# Altium PCB PCB1.PcbDoc
Units mil, origin at the board's own origin, x right, y up, seen from the top; angles counter-clockwise.
Board outline 3937.01 x 3346.46 mil, 2 copper layers (Top Layer, Bottom Layer), stack 62.992 mil thick; 38 components, 44 nets, 165 pads, 31 vias.
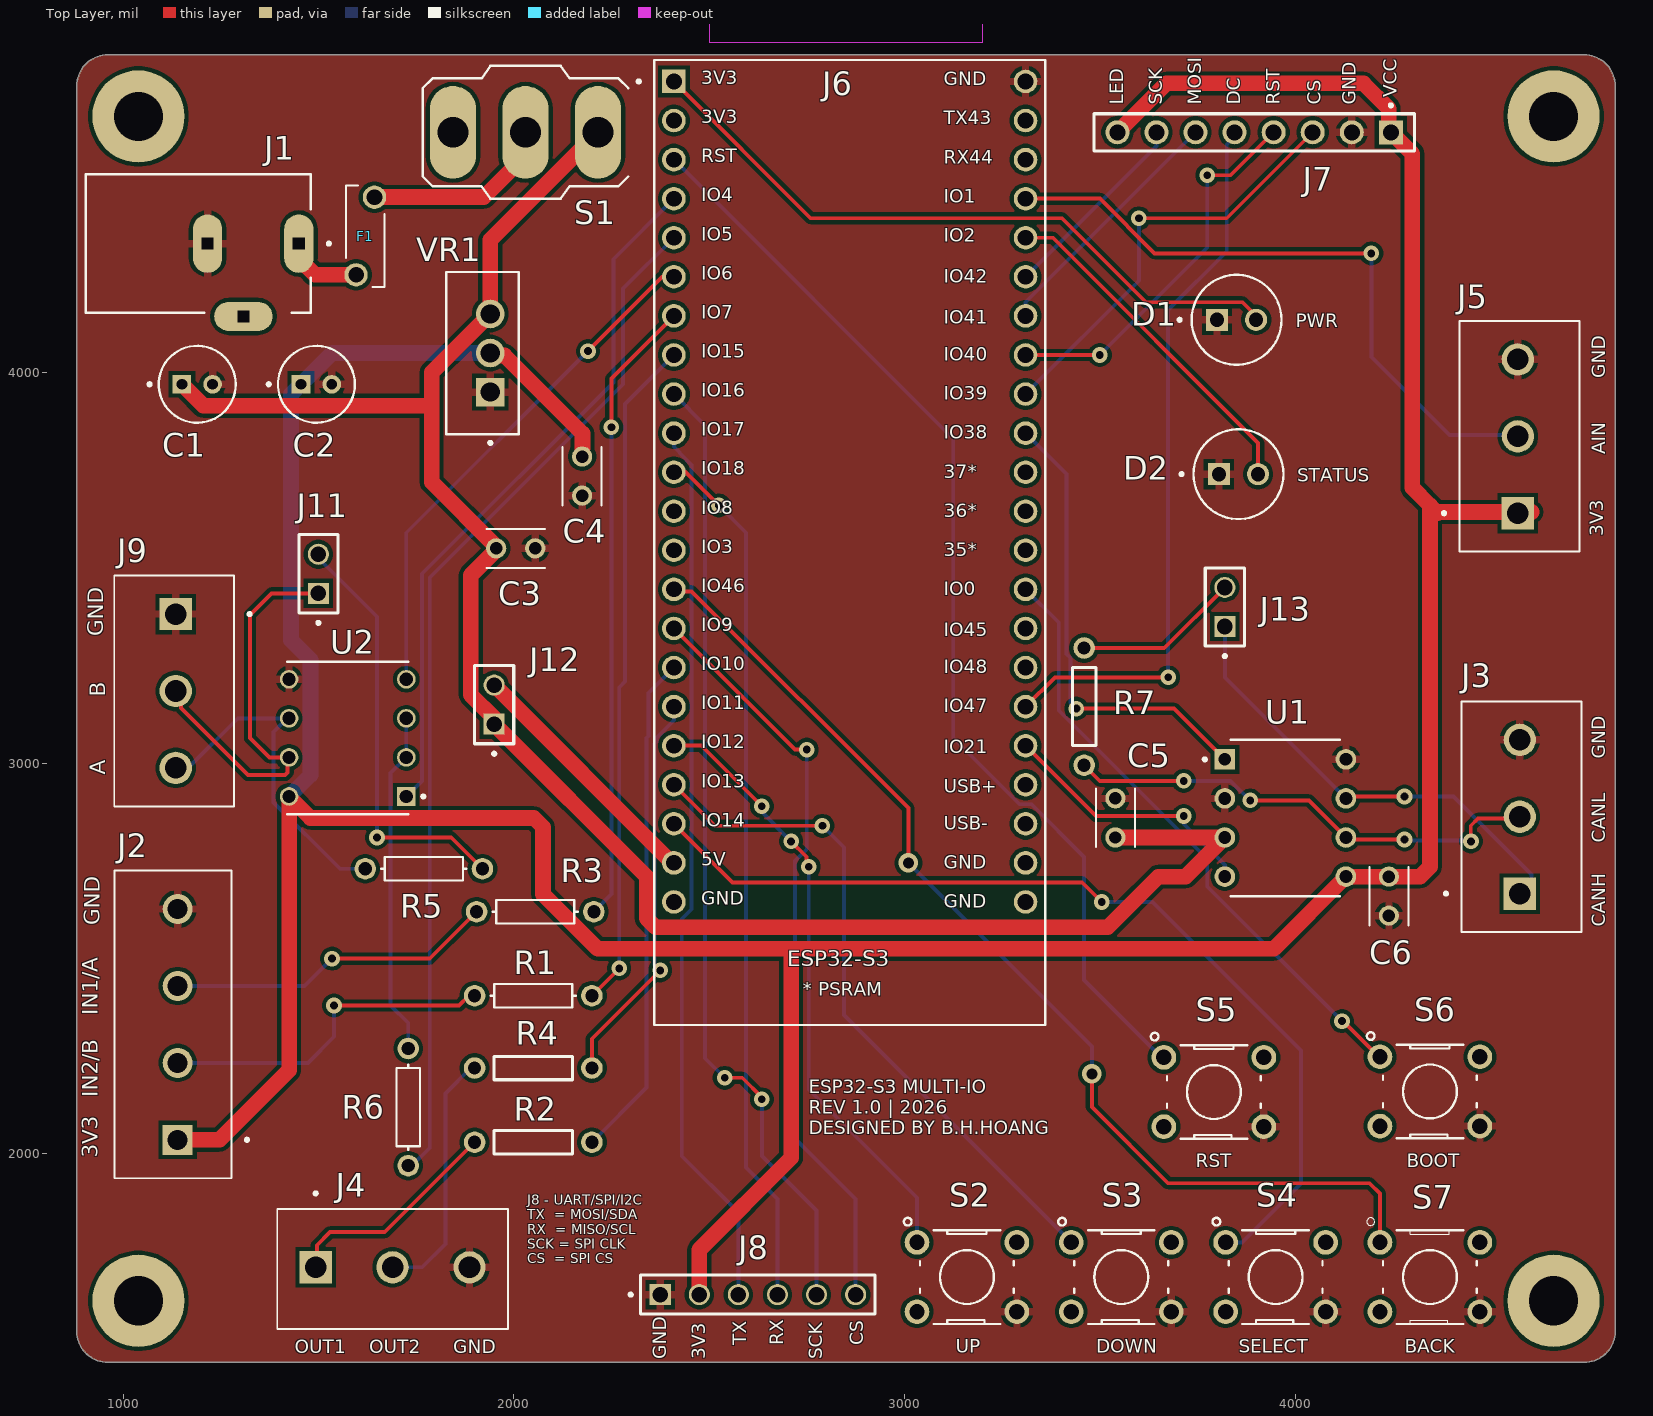
[diagram p0: Top Layer view]
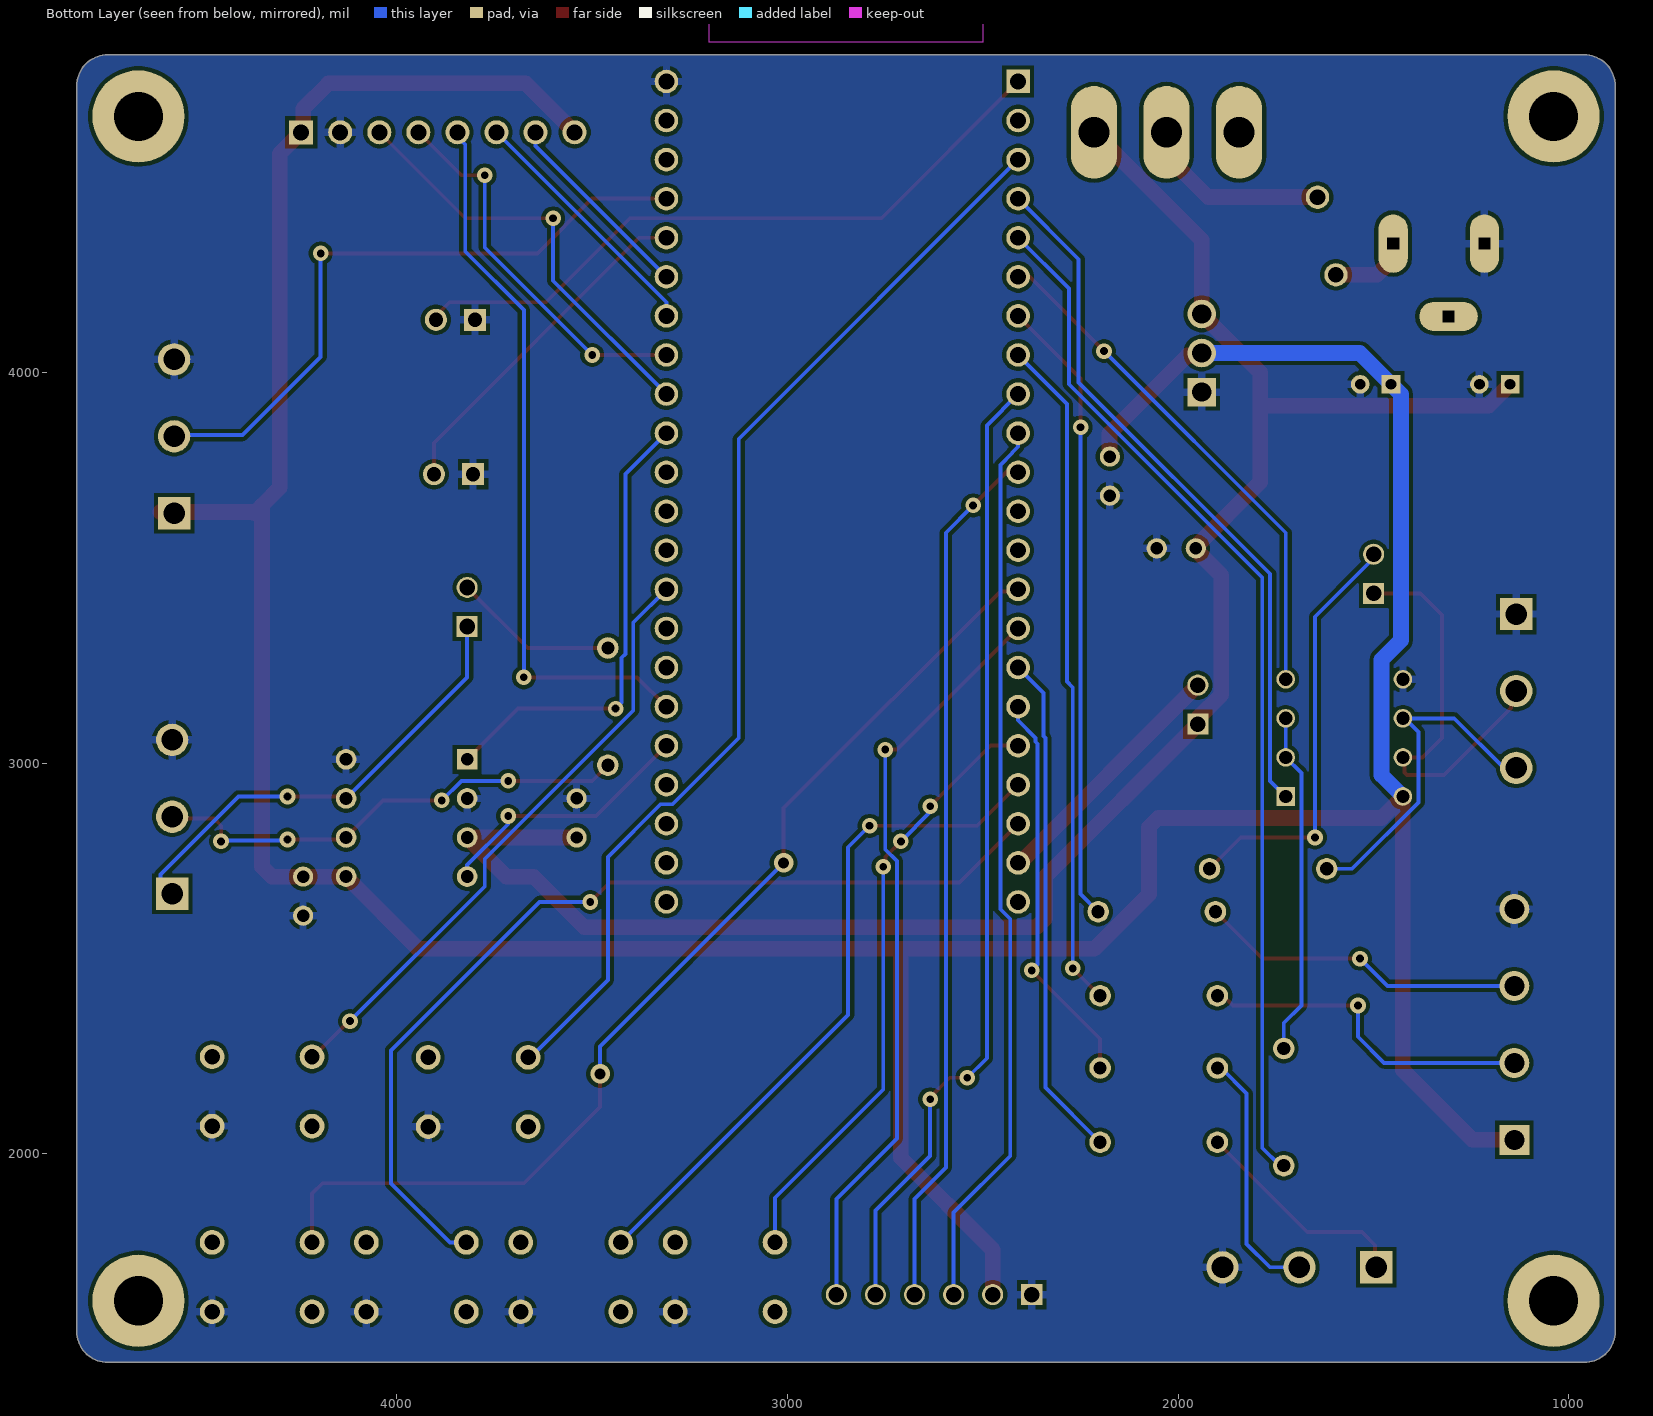
[diagram p1: Bottom Layer view, seen from below]
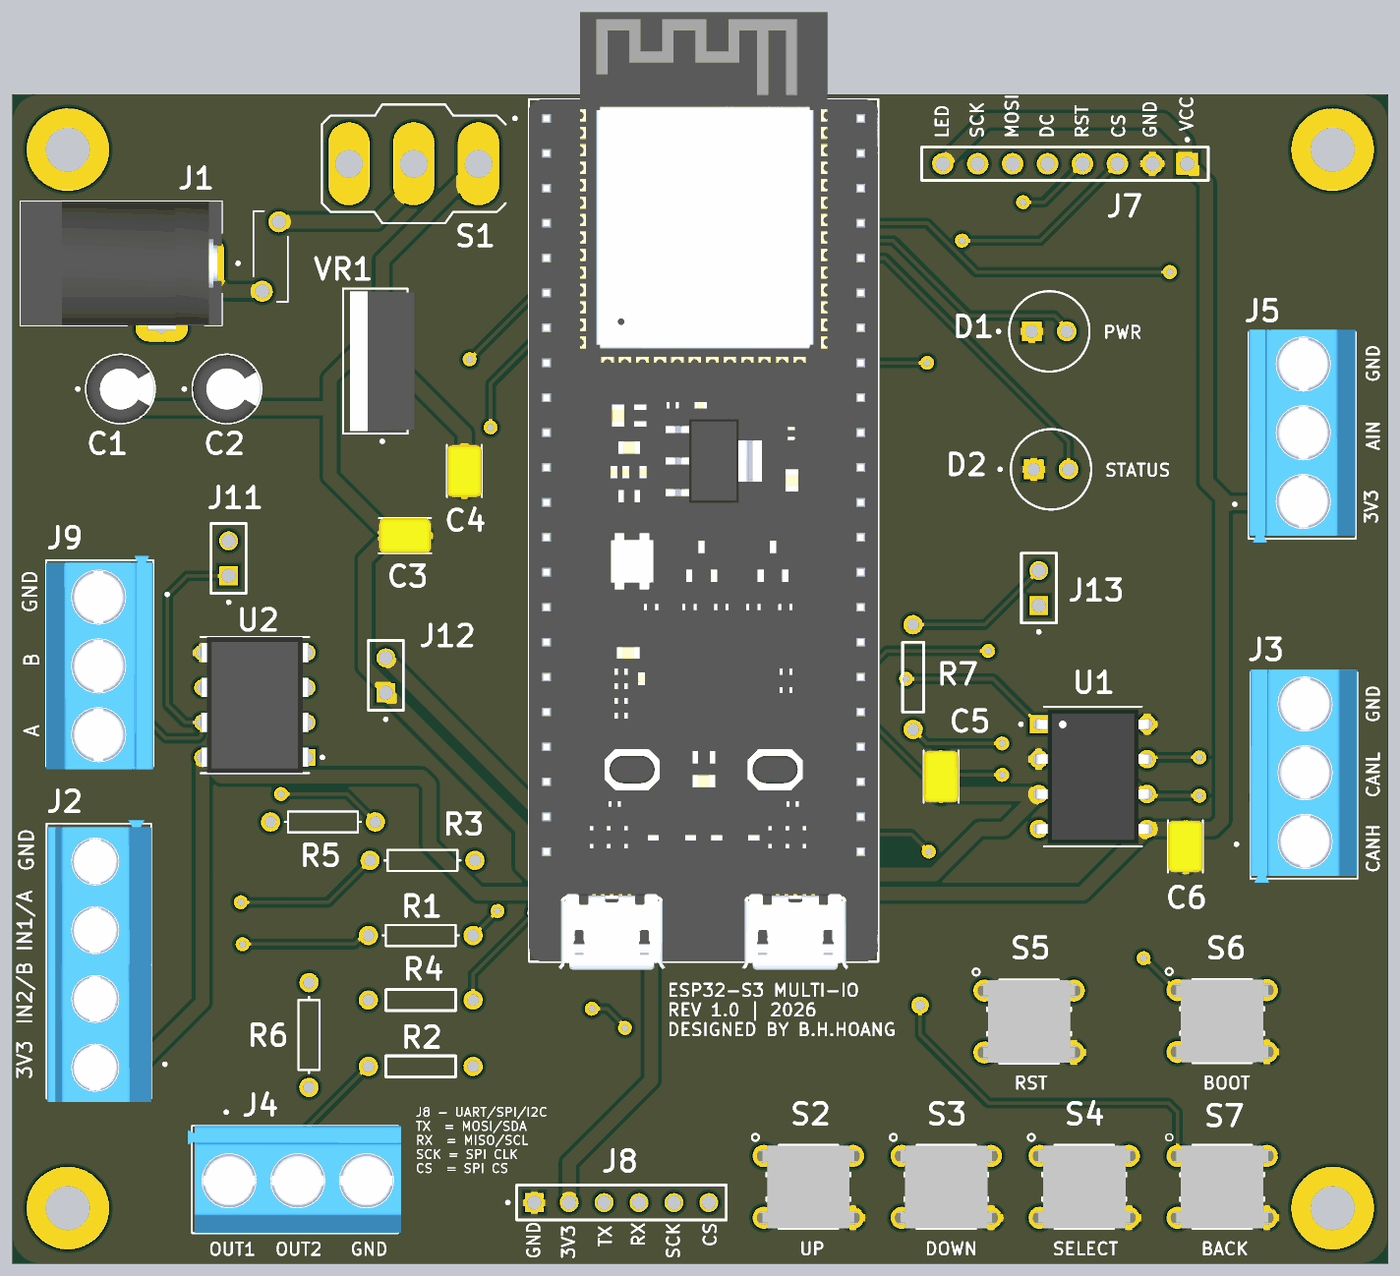
[diagram p2: 3D render of the assembled board from above, using the file's embedded part models]

## Layer stack, top to bottom
Top Solder: solder mask 0.4, Solder Resist, Dk 3.5
Top Layer: signal copper 1.4
Dielectric 1: dielectric 60.1921, FR-4, Dk 4.8
Bottom Layer: signal copper 1.4
Bottom Solder: solder mask 0.4, Solder Resist, Dk 3.5

## Board outline
881.94,1545.35 ccw(c960.68,1545.35) 960.68,1466.61 4740.21,1466.61 ccw(c4740.21,1545.35) 4818.95,1545.35 4818.95,4734.32 ccw(c4740.21,4734.32) 4740.21,4813.06 960.68,4813.06 ccw(c960.68,4734.32) 881.94,4734.32

## Design rules (kind name [scope] priority, off if disabled: settings)
Clearance [All] p1: gap=10 ignorepadtopadclearanceinfootprint=FALSE except(0: Arc-Hole Track-Hole SMDPad-Hole THPad-Hole Via-Hole Fill-Hole Poly-Hole Region-Hole Text-Hole)
HoleSize [All] p1: absolutevalues=TRUE maxlimit=125.98 minlimit=11.81 maxpercent=80.000 minpercent=20.000 // Minimum drilled hole 0.30 mm; maximum 3.20 mm includes four M3 mounting holes MH1-MH4.
PolygonConnect [All] p1: connectstyle=Relief reliefconductorwidth=20 reliefentries=4 polygonreliefangle="90 Angle" airgapwidth=10
RoutingVias [All] p1: holewidth=20 width=40 viastyle="Through Hole" minholewidth=20 minwidth=40 maxholewidth=28 maxwidth=50
SolderMaskExpansion [All] p1: expansion=4 istentingtop=FALSE
Width POWER_5V_WIDTH [InNet('MAIN5V') Or InNet('NetF1_1') Or InNet('NetF1_2') Or InNet('DEVKIT5V')] p1: maxlimit=60 minlimit=20 preferedwidth=40
Width POWER_3V3_WIDTH [InNet('3V3')] p2: maxlimit=60 minlimit=20 preferedwidth=40
Width GND_WIDTH [InNet('GND')] p3: maxlimit=60 minlimit=20 preferedwidth=40
Width [All] p4: maxlimit=10 minlimit=10 preferedwidth=10
29 further rules are at their usual default settings.

## Components (designator, comment, footprint, x,y, rotation, side; value= is the part's Value field where it differs from the comment)
C1 "UVR1C220MDD" CAPPRD200W50D550H1250 1190,3970 r0 top
C2 "UVR1C220MDD" CAPPRD200W50D550H1250 1495,3970 r0 top
C3 "C315C104K5R5TA" CAPRR254W54L381T254H466B 2005,3550 r0 top
C4 "C315C104K5R5TA" CAPRR254W54L381T254H466B 2175,3735 r90 top
C5 "C315C104K5R5TA" CAPRR254W54L381T254H466B 3540,2860 r270 top
C6 "C315C104K5R5TA" CAPRR254W54L381T254H466B 4240,2660 r90 top
D1 "HLMP-4740" LEDRD254W47D584H1078 3850,4135 r0 top
D2 "HLMP-4740" LEDRD254W47D584H1078 3855,3740 r0 top
F1 "RUEF110" FUSRR505W81L660T250H1360 1620.02,4349.41 r90 top
J1 "EJ503A" MPD_EJ503A 1192.52,4330 r270 top
J2 "TB002-500-04BE" CUI_TB002-500-04BE 1140,2036.3 r90 top
J3 "TB003-500-P03GY" CUI_TB003-500-P03GY 4575,2666.3 r90 top
J4 "TB003-500-P03GY" CUI_TB003-500-P03GY 1493.15,1710 r0 top
J5 "TB003-500-P03GY" CUI_TB003-500-P03GY 4570,3640 r90 top
J6 "ESP32-S3-DEVKITC-1-N8R8" ESP32-S3-DEVKITC-1-N8R8 2860,3565.08 r0 top
J7 "SSW-108-XX-X-S" SAMTEC_SSW-108-XX-X-S 3895,4615 r180 top
J8 "TSW-106-07-G-S" SAMTEC_TSW-106-07-G-S 2625,1640 r0 top
J9 "TB003-500-P03GY" CUI_TB003-500-P03GY 1135,3381.85 r270 top
J11 "TSW-102-07-G-S" SAMTEC_TSW-102-07-G-S 1500,3485 r90 top
J12 "DEVKIT POWER" SAMTEC_TSW-102-07-G-S 1950,3150 r90 top
J13 "TSW-102-07-G-S" SAMTEC_TSW-102-07-G-S 3820,3400 r90 top
R1 "Res1" AXIAL-0.3 2055,2620 r0 top value=1K
R2 "330" AXIAL-0.3 2050,2030 r180 top value=1K
R3 "Res1" AXIAL-0.3 2050,2405 r0 top value=1K
R4 "330" AXIAL-0.3 2050,2220 r180 top value=1K
R5 "120" AXIAL-0.3 1770,2730 r0 top value=1K
R6 "10k" AXIAL-0.3 1730,2120 r90 top
R7 "120" AXIAL-0.3 3460,3145 r90 top value=1K
S1 "MTS103" MTS103 2030,4615 r270 top
S2 "B3F-1000" SW_B3F-1000 3160,1685 r0 top
S3 "B3F-1000" SW_B3F-1000 3555,1685 r0 top
S4 "B3F-1000" SW_B3F-1000 3950,1685 r0 top
S5 "B3F-1000" SW_B3F-1000 3792.05,2158.58 r0 top
S6 "B3F-1000" SW_B3F-1000 4345,2160 r0 top
S7 "B3F-1000" SW_B3F-1000 4345,1685 r0 top
U1 "MCP2562-E/P" DIP787W45P254L1016H533Q8 3975,2860 r0 top
U2 "MAX3485CPA+" DIP762W47P254L991H457Q8 1575,3065 r180 top
VR1 "LM1117T-3.3/NOPB" TO254P1054X470X1955-3 1940,4050 r90 top

## Footprints (in the part's own frame and the unit in brackets; to place one, negate y for a bottom-side part, rotate by r counter-clockwise, add the part's x,y. Pads: shape width x height; smd on the part's side, far side on the other; paste and mask are expansions set on the pad)
AXIAL-0.3 [mm] "Axial Device, Thru-Hole; 2 Leads; 0.3 in Pin Spacing"
  round 1.4 hole 0.85: 1(-3.81,0) 2(3.81,0)
  silkscreen extent -2.77,-0.76 2.77,0.76
CAPPRD200W50D550H1250 [mm]
  rect 1.208x1.208 / inner round 1.208 / far side rect 1.208x1.208 hole 0.7: 1(-1,0)
  round 1.208 hole 0.7: 2(1,0)
  silkscreen extent -3.2,-2.5 2.5,2.5, body extent -2.5,-2.5 2.5,2.5, height 12.5
CAPRR254W54L381T254H466B [mm]
  round 1.318 hole 0.81: 1(-1.27,0) 2(1.27,0)
  silkscreen extent -1.91,-1.27 1.91,1.27, body extent -1.91,-1.27 1.91,1.27, height 3.14
CUI_TB002-500-04BE [mm]
  rect 1.95x1.95 / inner round 1.95 / far side rect 1.95x1.95 hole 1.3: 1(0,0)
  round 1.95 hole 1.3: 2(5,0) 3(10,0) 4(15,0)
  silkscreen extent -2.5,-4.6 17.5,4.1, body extent -2.76,-3.54 17.74,4.06, height 10
CUI_TB003-500-P03GY [mm]
  rect 2.1x2.1 / inner round 2.1 / far side rect 2.1x2.1 hole 1.4 mask+0.102: 1(0,0)
  round 2.1 hole 1.4 mask+0.102: 2(5,0) 3(10,0)
  silkscreen extent -2.5,-4 12.5,4.9, body extent -2.8,-3.99 12.7,3.81, height 10.3
DIP762W47P254L991H457Q8 [mm]
  rect 1.21x1.21 / inner round 1.21 / far side rect 1.21x1.21 hole 0.86: 1(-3.81,3.81)
  round 1.21 hole 0.86: 2(-3.81,1.27) 3(-3.81,-1.27) 4(-3.81,-3.81) 5(3.81,-3.81) 6(3.81,-1.27) 7(3.81,1.27) 8(3.81,3.81)
  silkscreen extent -5.01,-4.95 3.94,4.95, body extent -3.92,-4.95 3.92,4.95, height 4.57
DIP787W45P254L1016H533Q8 [mil]
  rect 52.68x52.68 / inner round 52.68 / far side rect 52.68x52.68 hole 32.68 mask+4.02: 1(-155,150)
  round 52.68 hole 32.68 mask+4.02: 2(-155,50) 3(-155,-50) 4(-155,-150) 5(155,-150) 6(155,-50) 7(155,50) 8(155,150)
  silkscreen extent -210,-200 140,200, body extent -165,-193 165,193, height 170
ESP32-S3-DEVKITC-1-N8R8 [mm]
  rect 1.53x1.53 / inner round 1.53 / far side rect 1.53x1.53 hole 1.02: J1_1(-11.43,29.97)
  round 1.53 hole 1.02: J1_2(-11.43,27.43) J1_3(-11.43,24.89) J1_4(-11.43,22.35) J1_5(-11.43,19.81) J1_6(-11.43,17.27) J1_7(-11.43,14.73) J1_8(-11.43,12.19) J1_9(-11.43,9.65) J1_10(-11.43,7.11) J1_11(-11.43,4.57) J1_12(-11.43,2.03) J1_13(-11.43,-0.51) J1_14(-11.43,-3.05) J1_15(-11.43,-5.59) J1_16(-11.43,-8.13) J1_17(-11.43,-10.67) J1_18(-11.43,-13.21) J1_19(-11.43,-15.75) J1_20(-11.43,-18.29) J1_21(-11.43,-20.83) J1_22(-11.43,-23.37) J3_1(11.43,29.97) J3_2(11.43,27.43) J3_3(11.43,24.89) J3_4(11.43,22.35) J3_5(11.43,19.81) J3_6(11.43,17.27) J3_7(11.43,14.73) J3_8(11.43,12.19) J3_9(11.43,9.65) J3_10(11.43,7.11) J3_11(11.43,4.57) J3_12(11.43,2.03) J3_13(11.43,-0.51) J3_14(11.43,-3.05) J3_15(11.43,-5.59) J3_16(11.43,-8.13) J3_17(11.43,-10.67) J3_18(11.43,-13.21) J3_19(11.43,-15.75) J3_20(11.43,-18.29) J3_21(11.43,-20.83) J3_22(11.43,-23.37)
  silkscreen extent -13.82,-31.37 12.7,31.37, body extent -12.7,-31.96 12.7,37.68, height 7.39
FUSRR505W81L660T250H1360 [mm]
  round 1.52 hole 1.01 mask+0.102: 1(-2.525,0.6) 2(2.525,-0.6)
  silkscreen extent -3.3,-1.25 3.3,1.25
LEDRD254W47D584H1078 [mm]
  rect 1.438x1.438 / inner round 1.438 / far side rect 1.438x1.438 hole 0.93 mask+0.102: 1(-1.27,0)
  round 1.438 hole 0.93 mask+0.102: 2(1.27,0)
  silkscreen extent -3.8,-2.92 2.92,2.92
MPD_EJ503A [mm]
  oval 3.8x1.9 hole 0.76 square: 1(0,6.54) 2(0,0.61)
  oval 1.9x3.8 hole 0.76 square: 3(4.73,2.94)
  silkscreen extent -4.5,-7.31 4.5,8.59, body extent -4.5,-7.31 4.88,7.31, height 11
MTS103 [mil]
  oval 237x118.5 hole 79: 1(0,185.56) 2(0,0) 3(0,-185.56)
  silkscreen extent -170,-263 170,263
SAMTEC_SSW-108-XX-X-S [mm]
  rect 1.56x1.56 / inner round 1.56 / far side rect 1.56x1.56 hole 1.04: 01(-8.89,0)
  round 1.56 hole 1.04: 02(-6.35,0) 03(-3.81,0) 04(-1.27,0) 05(1.27,0) 06(3.81,0) 07(6.35,0) 08(8.89,0)
  silkscreen extent -10.42,-1.85 10.42,1.2
SAMTEC_TSW-102-07-G-S [mm]
  rect 1.37x1.37 / inner round 1.37 / far side rect 1.37x1.37 hole 1.02: 01(-1.27,0)
  round 1.37 hole 1.02: 02(1.27,0)
  silkscreen extent -3.29,-1.27 2.54,1.27
SAMTEC_TSW-106-07-G-S [mm]
  rect 1.37x1.37 hole 1.02: 01(-6.35,0)
  round 1.37 hole 1.02: 02(-3.81,0) 03(-1.27,0) 04(1.27,0) 05(3.81,0) 06(6.35,0)
  silkscreen extent -8.37,-1.27 7.62,1.27
SW_B3F-1000 [mm]
  round 1.6 hole 1: 1(-3.25,2.25) 2(3.25,2.25) 3(-3.25,-2.25) 4(3.25,-2.25)
  silkscreen extent -4.1,-3.05 3.05,3.85, body extent -3.85,-3 3.85,3, height 4.3
TO254P1054X470X1955-3 [mm]
  rect 1.86x1.86 / inner round 1.86 / far side rect 1.86x1.86 hole 1.24: 1(-2.54,0)
  round 1.86 hole 1.24: 2(0,0) 3(2.54,0)
  silkscreen extent -5.94,-1.84 5.27,2.86, body extent -5.08,-2.35 5.08,2.35, height 15.49

## Part data
C1 C2: "Capacitor, Aluminum Electrolytic, Cap 22uF 16V 20%, Radial 5X11 LS 5 mm", Package="RADIAL-2 NICHICON", Check_prices=https://www.snapeda.com/parts/UVR1C220MDD/Nichicon/view-part/?ref=eda, MF=Nichicon, MP=UVR1C220MDD, SnapEDA_Link=https://www.snapeda.com/parts/UVR1C220MDD/Nichicon/view-part/?ref=snap
C3 C4 C5 C6: "Capacitor, Ceramic, 100nF, 50VDC, 10-% Tol, 10+% Tol, X7R-TC Code, -15, 15%-TC", Package="RADIAL-2 KEMET", Check_prices=https://www.snapeda.com/parts/C315C104K5R5TA/KEMET/view-part/?ref=eda, MF=KEMET, MP=C315C104K5R5TA, SnapEDA_Link=https://www.snapeda.com/parts/C315C104K5R5TA/KEMET/view-part/?ref=snap
D1 D2: "LED Circuit Board Indicator LED Circuit Board Indicator Single Green Diffused, Tinted 1.9V 2mA - - Through Hole, Right Angle", Package="Radial Broadcom / Avago", Check_prices=https://www.snapeda.com/parts/HLMP-4740/Broadcom/view-part/?ref=eda, MF=Broadcom, MP=HLMP-4740, SnapEDA_Link=https://www.snapeda.com/parts/HLMP-4740/Broadcom/view-part/?ref=snap
F1: "Description", Manufacturer_Name="Littelfuse Inc", Copyright="Copyright (C) 2026 Ultra Librarian. All rights reserved.", Manufacturer_Part_Number=RUEF110
J1: "Power Barrel Connector Jack 2.10mm ID (0.083), 5.50mm OD (0.217) Through Hole, Right Angle", Package=None, Availability="In Stock", Check_prices=https://www.snapeda.com/parts/EJ503A/MPD+%2528Memory+Protection+Devices%2529/view-part/?ref=eda, MF=MPD, MP=EJ503A, Price=None, Purchase-URL=https://pricing.snapeda.com/search?q=EJ503A&ref=eda, SnapEDA_Link=https://www.snapeda.com/parts/EJ503A/MPD+%2528Memory+Protection+Devices%2529/view-part/?ref=snap
J2: "2~24 Poles, Screw Type, Horizontal, 5.0 Pitch, 22~12 (AWG), Terminal Block Connector", Package=None, Check_prices=https://www.snapeda.com/parts/TB002-500-04BE/Same+Sky/view-part/?ref=eda, MF="Same Sky", MP=TB002-500-04BE, SnapEDA_Link=https://www.snapeda.com/parts/TB002-500-04BE/Same+Sky/view-part/?ref=snap
J3 J4 J5 J9: "2~24 Poles, Screw Type, Horizontal, 5.0 Pitch, 26~14 (AWG), Terminal Block Connector", MANUFACTURER="Same Sky", DATASHEET_URL=https://s3.amazonaws.com/snapeda/datasheet/TB003-500-P03GY_Same_Sky.pdf, MPN=TB003-500-P03GY, SOURCE_URL=https://www.snapeda.com/parts/TB003-500-P03GY/Same+Sky/view-part/, STANDARD="Manufacturer Recommendations"
J6: "The ESP32-S3-DEVKITC-1-N8R8 from Espressif Systems is a development board designed for RF, RFID, and wireless applications. It supports 802.11 b/g/n Wi-Fi and BluetoothÂ® 5.x (BLE) connectivity at 2.4GHz, making it ideal for IoT and wireless communication", Package=None, Check_prices=https://www.snapeda.com/parts/ESP32-S3-DEVKITC-1-N8R8/Espressif+Systems/view-part/?ref=eda, MF="Espressif Systems", MP=ESP32-S3-DEVKITC-1-N8R8, SnapEDA_Link=https://www.snapeda.com/parts/ESP32-S3-DEVKITC-1-N8R8/Espressif+Systems/view-part/?ref=snap
J7: "8 Position Receptacle Connector 0.100 (2.54mm) Through Hole, Right Angle Gold", Package=None, Check_prices=https://www.snapeda.com/parts/SSW-108-23-G-S/Samtec/view-part/?ref=eda, MF=Samtec, MP=SSW-108-23-G-S, SnapEDA_Link=https://www.snapeda.com/parts/SSW-108-23-G-S/Samtec/view-part/?ref=snap
J8 U1: Package=None, Availability=Unavailable, Price=None
  J8: MF="Samtec Inc.", MP=TSW-106-07-G-S
  U1: MP=MCP2562-E/P
J11 J13: "<a href=\"https://pricing.snapeda.com/parts/TSW-102-07-G-S/Samtec/view-part?ref=eda\">Check availability</a>", Package=None, Availability=Unavailable, MF="Samtec Inc.", MP=TSW-102-07-G-S, Price=None
J12: library part TSW-102-07-G-S, "<a href=\"https://pricing.snapeda.com/parts/TSW-102-07-G-S/Samtec/view-part?ref=eda\">Check availability</a>", Package=None, Availability=Unavailable, MF="Samtec Inc.", MP=TSW-102-07-G-S, Price=None
R1 R3: "Resistor", LatestRevisionDate=17-Jul-2002, LatestRevisionNote="Re-released for DXP Platform.", PackageDescription="Axial Device, Thru-Hole; 2 Leads; 0.3 in Pin Spacing", PackageReference=AXIAL-0.3, Published=8-Jun-2000, Publisher="Altium Limited"
R2 R4 R5 R6 R7: library part Res1, "Resistor", LatestRevisionDate=17-Jul-2002, LatestRevisionNote="Re-released for DXP Platform.", PackageDescription="Axial Device, Thru-Hole; 2 Leads; 0.3 in Pin Spacing", PackageReference=AXIAL-0.3, Published=8-Jun-2000, Publisher="Altium Limited"
  R2 R4: parameters=Value=330
  R5 R7: parameters=Value=120
S1: "SW TOG 1P2T 6A ON-OFF-ON MINI SOL THR", Package=None, Check_prices=https://www.snapeda.com/parts/MTS-103/CIF/view-part/?ref=eda, MF="Not Specified", MP=MTS-103, SnapEDA_Link=https://www.snapeda.com/parts/MTS-103/CIF/view-part/?ref=snap
S2 S3 S4 S5 S6 S7: "Tactile Switch SPST-NO Top Actuated Through Hole", Package=None, Availability="In Stock", Check_prices=https://www.snapeda.com/parts/B3F-1000/Omron+Electronics+Inc-EMC+Div/view-part/?ref=eda, MF=Omron, MP=B3F-1000, Price=None, Purchase-URL=https://pricing.snapeda.com/search/part/B3F-1000/?ref=eda, SnapEDA_Link=https://www.snapeda.com/parts/B3F-1000/Omron+Electronics+Inc-EMC+Div/view-part/?ref=snap
U2: "Single Transmitter/Receiver RS-422/RS-485 8-Pin PDIP N", Package=PDIP-8, Availability=Unavailable, Check_prices=https://www.snapeda.com/parts/MAX3485CPA+/Analog+Devices/view-part/?ref=eda, MF="Analog Devices", MP=MAX3485CPA+, Price=None, SnapEDA_Link=https://www.snapeda.com/parts/MAX3485CPA+/Analog+Devices/view-part/?ref=snap
VR1: "800-mA 15-V linear voltage regulator", Package="TO-220-3 Texas Instruments", Check_prices=https://www.snapeda.com/parts/LM1117T-3.3/NOPB/Texas+Instruments/view-part/?ref=eda, MF="Texas Instruments", MP=LM1117T-3.3/NOPB, SnapEDA_Link=https://www.snapeda.com/parts/LM1117T-3.3/NOPB/Texas+Instruments/view-part/?ref=snap

## Free pads (board coordinates)
  round 236.22 hole 125.98 unplated: MH1(1039.42,1624.09) MH2(4661.47,1624.09) MH3(4661.47,4655.58) MH4(1039.42,4655.58)

## Via types
v1: diameter 40, hole 20, Top Layer to Bottom Layer, 29 vias
v2: diameter 50, hole 28, Top Layer to Bottom Layer, 2 vias

## Nets (pads, with @x,y where several pads share a name; then routed paths per layer and width w, separated by ;. In a path a pad name is that pad's centre, name@x,y a point inside that pad or via, vN(x,y) a via of type N, cw(c..) or ccw(c..) an arc to the next point about the centre after c; other vN are vias at no path point)
3V3: C2.1 C4.2 C6.2 J2.1 J5.1 J7.01 J7.08 J8.02 U1.5 U2.8 VR1.2 | length 10319.7
  Top Layer w40: J2.1 1246.85,2036.3 1425,2214.45 U2.8 1480,2860 2051.57,2860 2075,2836.57 2075,2665 2215,2525 2710,2525 ; VR1.2 1946.36,4043.64 1976.36,4043.64 2175.87,3844.13 2175.87,3805.87 C4.2@2175,3805 ; J8.02 2475,1755 2710,1990 2710,2525 ; J7.08 3670,4740 4175,4740 4239.36,4675.64 4239.36,4620.64 4300,4560 4300,3705 4345,3660 ; C6.2@4255,2710 4235,2710 U1.5 3945,2525 2710,2525 ; C6.2@4260,2710 4320,2710 4345,2735 4345,3640 4345,3660 ; J5.1@4605,3643.15 4565,3643.15 4368.15,3643.15 4365,3640 4345,3660
  Bottom Layer w40: U2.8 1480,2970 1480,3265 1430,3315 1430,3944.37 C2.1 1535.63,4050 VR1.2
A: J9.3 R5.1 U2.6 | length 868.2
  Bottom Layer w10: J9.3@1165,2986.3 1293.7,3115 U2.6@1420,3115 ; U2.6 U2.6@1420,3115 ; R5.1@1640,2730 1555,2730 1385,2900 1385,3080 U2.6@1420,3115
ADCIN1: J5.2 J6.J3_4 | length 1700.8
  Top Layer w10: J6.J3_4 3500.5,4445 3640.5,4305 v1(4195,4305)
  Bottom Layer w10: v1(4195,4305) 4195,4040 4395,3840 J5.2@4605,3840
B: J9.2 J11.01 U2.7 | length 1059.4
  Top Layer w10: J9.2 1148.91,3171.09 1148.91,3141.09 1320,2970 1415,2970 1421.18,2976.18 1421.18,3011.18 U2.7 1421.18,3015 1374.72,3015 1325,3064.72 1325,3380 1380,3435 J11.01@1490,3435
BT1: J6.J1_18 S2.1 | length 1570.1
  Top Layer w10: J6.J1_18 2480,3045 v1(2635,2890) ; v1(2710,2800) 2749.26,2760.74 2749.26,2740.74 v1(2755,2735)
  Bottom Layer w10: v1(2635,2890) 2635,2875 v1(2710,2800) ; v1(2755,2735) 2755,2165 3032.05,1887.95 S2.1
BT2: J6.J1_19 S3.1 | length 1747.9
  Top Layer w10: J6.J1_19 2515,2840 v1(2790,2840)
  Bottom Layer w10: v1(2790,2840) 2845,2785 2845,2405.63 2845,2355.63 3409.74,1790.89 3424.02,1790.89 S3.1@3427.05,1793.92
BT3: J6.J1_20 S4.1 | length 2441.2
  Top Layer w10: J6.J1_20 2560,2695 3455,2695 v1(3505,2645)
  Bottom Layer w10: v1(3505,2645) 3635,2645 4015,2265 4015,1924.49 3864.1,1773.58 S4.1
BT4: J6.J1_3 S5.1 | length 2830.5
  Bottom Layer w10: J6.J1_3 3125,3830 3125,3065 3295,2895 3325,2895 3460,2760 3460,2445.63 S5.1@3657.05,2248.58
BT5: J6.J3_14 S6.1 | length 1575.4
  Top Layer w10: v1(4120,2340) 4122.81,2340 4214.23,2248.58 S6.1
  Bottom Layer w10: J6.J3_14 3395,3360 3395,3135 3775,2755 3775,2685 v1(4120,2340)
BT6: J6.J1_14 S7.1 | length 2735.4
  Top Layer w10: J6.J1_14 2415.12,3439.88 2455.12,3439.88 3010,2885 v2(3010,2745) ; v2(3480,2205) 3480,2120 3675,1925 4190.63,1925 4217.05,1898.58 S7.1
  Bottom Layer w10: v2(3010,2745) 3480,2275 v2@3480,2215
CAN_RX: J6.J3_18 U1.4 | length 678.1
  Top Layer w10: J6.J3_18 3490,2865 v1(3715,2865)
  Bottom Layer w10: v1(3715,2865) 3715,2845 3820,2740 U1.4
CAN_TX: J6.J3_10 U1.1 | length 1192.7
  Top Layer w10: v1(3440,3140) 3690,3140 U1.1
  Bottom Layer w10: J6.J3_10 3415,3740 3415,3280 3425,3270 3425,3155 v1(3440,3140)
CANH: J3.1 J13.01 U1.7 | length 1182
  Top Layer w10: U1.7 4135,2915 v1(4280,2915)
  Bottom Layer w10: J13.01 3820,3220 U1.7 ; v1(4280,2915) 4405,2915 4605,2715 J3.1@4605,2661.3
CANL: J3.2 R7.1 U1.6 | length 1274
  Top Layer w10: R7.1 3500,2955 v1(3715,2955) ; v1(3885,2905) 4035,2905 U1.6 4135,2805 v1(4280,2805) ; v1(4450,2800) 4449.5,2800.5 4449.5,2840 4467.65,2858.15 J3.2@4605,2858.15
  Bottom Layer w10: v1(3715,2955) 3835,2955 v1(3885,2905) ; v1(4280,2805) 4282.5,2802.5 4447.5,2802.5 v1(4450,2800)
CS: J6.J3_9 J7.03 | length 1106.2
  Top Layer w10: v1(3600,4395) 3825,4395 J7.03
  Bottom Layer w10: J6.J3_9 3600,4235 v1(3600,4395)
DC: J6.J3_17 J7.05 | length 1861.5
  Top Layer w10: J6.J3_17 3385,3220 v1(3675,3220)
  Bottom Layer w10: v1(3675,3220) 3675,4160 3825,4310 3825,4584.02 3845,4604.02 J7.05
DEVKIT5V: J6.J1_21 J12.02 | length 648.5
  Top Layer w40: J12.02 2405,2745 J6.J1_21
DI: J6.J1_6 U2.4 | length 1331.3
  Top Layer w10: v1(2190,4055) 2380,4245 J6.J1_6
  Bottom Layer w10: U2.4 1725,3590 v1(2190,4055)
Enable: J6.J1_5 R6.1 | length 2662.5
  Bottom Layer w10: R6.1 1740,1970 1785,2015 1785,3475 2280,3970 2280,4215 J6.J1_5
GND: C1.2 C2.2 C3.2 C4.1 C5.1 C6.1 D1.1 D2.1 J1.2 J2.4 J3.3 J4.3 J5.3 J6.J3_1 J7.02 J8.01 J9.1 S2.4 S3.4 S4.4 S5.4 S6.4 S7.4 U1.2 U1.8 U2.5 VR1.1
GP7: J6.J1_7 R1.2 | length 1609.9
  Top Layer w10: v1(2250,3860) 2250,3985 J6.J1_7
  Bottom Layer w10: R1.2 2250,2665 v1(2250,3860)
GP9: J6.J1_15 J8.06 | length 1940
  Top Layer w10: J6.J1_15 2720,3035 v1(2750,3035)
  Bottom Layer w10: v1(2750,3035) 2750,2779.5 2720,2749.5 2720,2040 2875,1885 J8.06
GP10: J6.J1_16 R2.1 | length 1302
  Bottom Layer w10: R2.1 2340,2170 2340,3065 2345,3070 2345,3075 2345,3180 J6.J1_16
GP11: J6.J1_17 R4.1 | length 1014.4
  Top Layer w10: R4.1@2200,2230 2200,2295 v1(2375,2470)
  Bottom Layer w10: v1(2375,2470) 2360,2485 2360,3050 2365,3055 2365,3065 2410,3110 J6.J1_17
GP15: J6.J1_8 R3.2 | length 1742
  Top Layer w10: R3.2@2185,2405 R3.2 v1(2270,2475)
  Bottom Layer w10: v1(2270,2475) 2270,3194.06 2285,3209.06 2285,3920 J6.J1_8
GP16: J6.J1_9 J8.05 | length 2482.5
  Top Layer w10: v1(2540,2195) 2585,2195 2635,2145 v1(2635,2140)
  Bottom Layer w10: J6.J1_9 2490,3865 2490,2245 v1(2540,2195) ; v1(2635,2140) 2635,1995 2775,1855 J8.05
GP17: J6.J1_10 J8.03 | length 2294.2
  Bottom Layer w10: J6.J1_10 2410,3810 2425,3795 2425,3793.81 2455.12,3763.69 2455.12,2626.31 2430,2601.19 2430,1995 2575,1850 J8.03
GP18: J6.J1_11 J8.04 | length 2232.3
  Top Layer w10: J6.J1_11 2440,3745 v1(2525,3660)
  Bottom Layer w10: v1(2525,3660) 2595,3590 2595,1965 2675,1885 J8.04
MAIN5V: C1.1 C3.1 C5.2 J12.01 S1.1 U1.3 VR1.3 | length 5000.1
  Top Layer w40: C1.1 1205.63,3915 1790,3915 ; S1.1 1940,4339.44 VR1.3 1790,4000 1790,3915 ; C5.2 U1.3 3720,2710 3650,2710 3520,2580 2363.43,2580 2340,2603.43 2340,2710 J12.01 1950,3115 1890,3175 1890,3481.32 1959.14,3550.46 1790,3719.6 1790,3915
NetD1_2: D1.2 J6.J1_1 | length 1752.7
  Top Layer w10: J6.J1_1 2760,4395 3403.28,4395 3618.28,4180 3865,4180 D1.2@3910,4135
NetD2_2: D2.2 J6.J3_5 | length 892.5
  Top Layer w10: J6.J3_5 3380,4345 3905,3820 D2.2
NetF1_1: F1.1 J1.1 | length 190.5
  Top Layer w40: J1.1 1450,4291.42 1490.83,4250.59 F1.1@1584.98,4250.59
NetF1_2: F1.2 S1.2 | length 489.7
  Top Layer w40: F1.2@1643.64,4449.41 1923.66,4449.41 2030,4555.75 S1.2
NetJ2_2: J2.2 R3.1 | length 863
  Top Layer w10: v1(1540,2380) 1860,2380 R3.1@1885,2405
  Bottom Layer w10: J2.2 1473.15,2233.15 1540,2300 v1(1540,2380)
NetJ2_3: J2.3 R1.1 | length 843.7
  Top Layer w10: v1(1535,2500) 1785,2500 R1.1
  Bottom Layer w10: J2.3 1465,2430 v1(1535,2500)
NetJ4_1: J4.1 R2.2 | length 569.2
  Top Layer w10: J4.1@1496.3,1710 1496.3,1766.3 1530,1800 1670,1800 R2.2
NetJ4_2: J4.2 R4.2 | length 636.8
  Bottom Layer w10: J4.2 1765,1710 1825,1770 1825,2155 R4.2@1890,2220
NetJ11_02: J11.02 R5.2 | length 1094.4
  Top Layer w10: v1(1650,2810) 1840,2810 R5.2
  Bottom Layer w10: J11.02@1490,3535 1650,3375 v1(1650,2810)
NetJ13_02: J13.02 R7.2 | length 424.2
  Top Layer w10: R7.2 3665,3295 J13.02
NetR6_2: R6.2 U2.2 U2.3 | length 880.2
  Bottom Layer w10: U2.3 U2.2 1685,2975 1685,2380 1730,2335 R6.2
RO: J6.J1_4 U2.1 | length 1813.7
  Bottom Layer w10: U2.1 1765,2955 1765,3485 2255,3975 2255,4290 J6.J1_4
RST: J6.J3_8 J7.04 | length 979.5
  Top Layer w10: J6.J3_8 v1(3500,4045) ; v1(3775,4505) 3835,4505 J7.04
  Bottom Layer w10: v1(3500,4045) 3775,4320 v1(3775,4505)
SCK: J6.J3_6 J7.07 | length 508.8
  Bottom Layer w10: J6.J3_6 3645,4580 J7.07
SDI: J6.J3_7 J7.06 | length 650.2
  Bottom Layer w10: J6.J3_7 3310,4180 J7.06
pads on no net: J1.3 J6.J1_2 J6.J1_12 J6.J1_13 J6.J1_22 J6.J3_2 J6.J3_3 J6.J3_11 J6.J3_12 J6.J3_13 J6.J3_15 J6.J3_16 J6.J3_19 J6.J3_20 J6.J3_21 J6.J3_22 S1.3 S2.2 S2.3 S3.2 S3.3 S4.2 S4.3 S5.2 S5.3 S6.2 S6.3 S7.2 S7.3

## Polygon pours and split planes (outlines as drawn)
GND on Top Layer "GND_L01_P000" (solid, remove dead copper, pour order 0): 881.94,1545.35 ccw(c960.68,1545.35) 960.68,1466.61 4740.21,1466.61 ccw(c4740.21,1545.35) 4818.95,1545.35 4818.95,4734.32 ccw(c4740.21,4734.32) 4740.21,4813.06 960.68,4813.06 ccw(c960.68,4734.32) 881.94,4734.32
GND on Bottom Layer "GND_L02_P001" (solid, remove dead copper, pour order 1): 881.94,1545.35 ccw(c960.68,1545.35) 960.68,1466.61 4740.21,1466.61 ccw(c4740.21,1545.35) 4818.95,1545.35 4818.95,4734.32 ccw(c4740.21,4734.32) 4740.21,4813.06 960.68,4813.06 ccw(c960.68,4734.32) 881.94,4734.32

## Keep-outs
Keep-Out Layer:
  rectangle: 2500,4845 3200,5195

## Silkscreen, mask and mechanical layers (free items; w line width, h text height)
Top Overlay:
  text "3V3" at 2480,4737.92 h35
  text "GND" at 3100,4735 h35
  text "VCC" at 4260,4705 h35 r90
  text "LED" at 3560,4685 h35 r90
  text "SCK" at 3660,4685 h35 r90
  text "MOSI" at 3760,4685 h35 r90
  text "DC" at 3860,4685 h35 r90
  text "RST" at 3960,4685 h35 r90
  text "CS" at 4065,4685 h35 r90
  text "GND" at 4155,4685 h35 r90
  text "3V3" at 2480,4637.92 h35
  text "TX43" at 3100,4635 h35
  text "RST" at 2480,4537.92 h35
  text "RX44" at 3100,4535 h35
  text "IO4" at 2480,4437.92 h35
  text "IO1" at 3100,4435 h35
  text "IO5" at 2480,4337.92 h35
  text "IO2" at 3100,4335 h35
  text "IO6" at 2480,4237.92 h35
  text "IO42" at 3100,4230 h35
  text "IO7" at 2480,4137.92 h35
  text "IO41" at 3100,4125 h35
  text "PWR" at 4000.98,4115.98 h35
  text "IO15" at 2480,4037.92 h35
  text "IO40" at 3100,4030 h35
  text "GND" at 4794,3986 h35 r90
  text "IO16" at 2480,3937.92 h35
  text "IO39" at 3100,3930 h35
  text "IO17" at 2480,3837.92 h35
  text "IO38" at 3100,3830 h35
  text "AIN" at 4794,3791 h35 r90
  text "IO18" at 2480,3737.92 h35
  text "37*" at 3100,3730 h35
  text "STATUS" at 4005.98,3720.98 h35
  text "IO8" at 2480,3637.92 h35
  text "36*" at 3100,3630 h35
  text "3V3" at 4789,3581 h35 r90
  text "IO3" at 2480,3537.92 h35
  text "35*" at 3100,3530 h35
  text "IO46" at 2480,3437.92 h35
  text "IO0" at 3100,3430 h35
  text "IO9" at 2480,3337.92 h35
  text "GND" at 950,3325 h40 r90
  text "IO45" at 3100,3325 h35
  text "IO10" at 2480,3237.92 h35
  text "IO48" at 3100,3230 h35
  text "B" at 955,3170 h40 r90
  text "IO11" at 2480,3137.92 h35
  text "IO47" at 3100,3130 h35
  text "IO12" at 2480,3037.92 h35
  text "IO21" at 3100,3025 h35
  text "GND" at 4794,3011 h35 r90
  text "A" at 955,2970 h40 r90
  text "IO13" at 2480,2937.92 h35
  text "USB+" at 3100,2925 h35
  text "IO14" at 2480,2837.92 h35
  text "USB-" at 3100,2830 h35
  text "CANL" at 4794,2796 h35 r90
  text "5V" at 2480,2737.92 h35
  text "GND" at 3100,2730 h35
  text "GND" at 2480,2637.92 h35
  text "GND" at 3100,2630 h35
  text "GND" at 940,2585 h40 r90
  text "CANH" at 4794,2581 h35 r90
  text "ESP32-S3" at 2700,2480 h40
  text "* PSRAM" at 2740,2405 h35
  text "IN1/A" at 935,2355 h40 r90
  text "IN2/B" at 935,2145 h40 r90
  text "ESP32-S3 MULTI-IO / REV 1.0 | 2026 / DESIGNED BY B.H.HOANG" at 2755,2050 h35
  text "3V3" at 935,1990 h40 r90
  text "RST" at 3746,1966 h35
  text "BOOT" at 4286,1966 h35
  text "J8 - UART/SPI/I2C / TX  = MOSI/SDA / RX  = MISO/SCL / SCK = SPI CLK / CS  = SPI CS" at 2035,1720 h25
  text "TX" at 2595,1510 h35 r90
  text "RX" at 2690,1510 h35 r90
  text "CS" at 2895,1510 h35 r90
  text "UP" at 3131,1491 h35
  text "DOWN" at 3491,1491 h35
  text "SELECT" at 3856,1491 h35
  text "BACK" at 4281,1491 h35
  text "OUT1" at 1440,1490 h35
  text "OUT2" at 1630,1490 h35
  text "GND" at 1845,1490 h35
  text "GND" at 2390,1475 h35 r90
  text "3V3" at 2490,1475 h35 r90
  text "SCK" at 2790,1475 h35 r90
Mechanical 1:
  the board outline again, w4